# Altium PCB PI5_Robo_Board_PCB.PcbDoc (part 2 of 3)
Units mm, origin at the board's own origin, x right, y up, seen from the top; angles counter-clockwise.
Board outline 98.8 x 131.2 mm, 4 copper layers (TOP1, SIG2, SIG3, BOT4), stack 1.399 mm thick; 219 components, 149 nets, 779 pads, 462 vias.
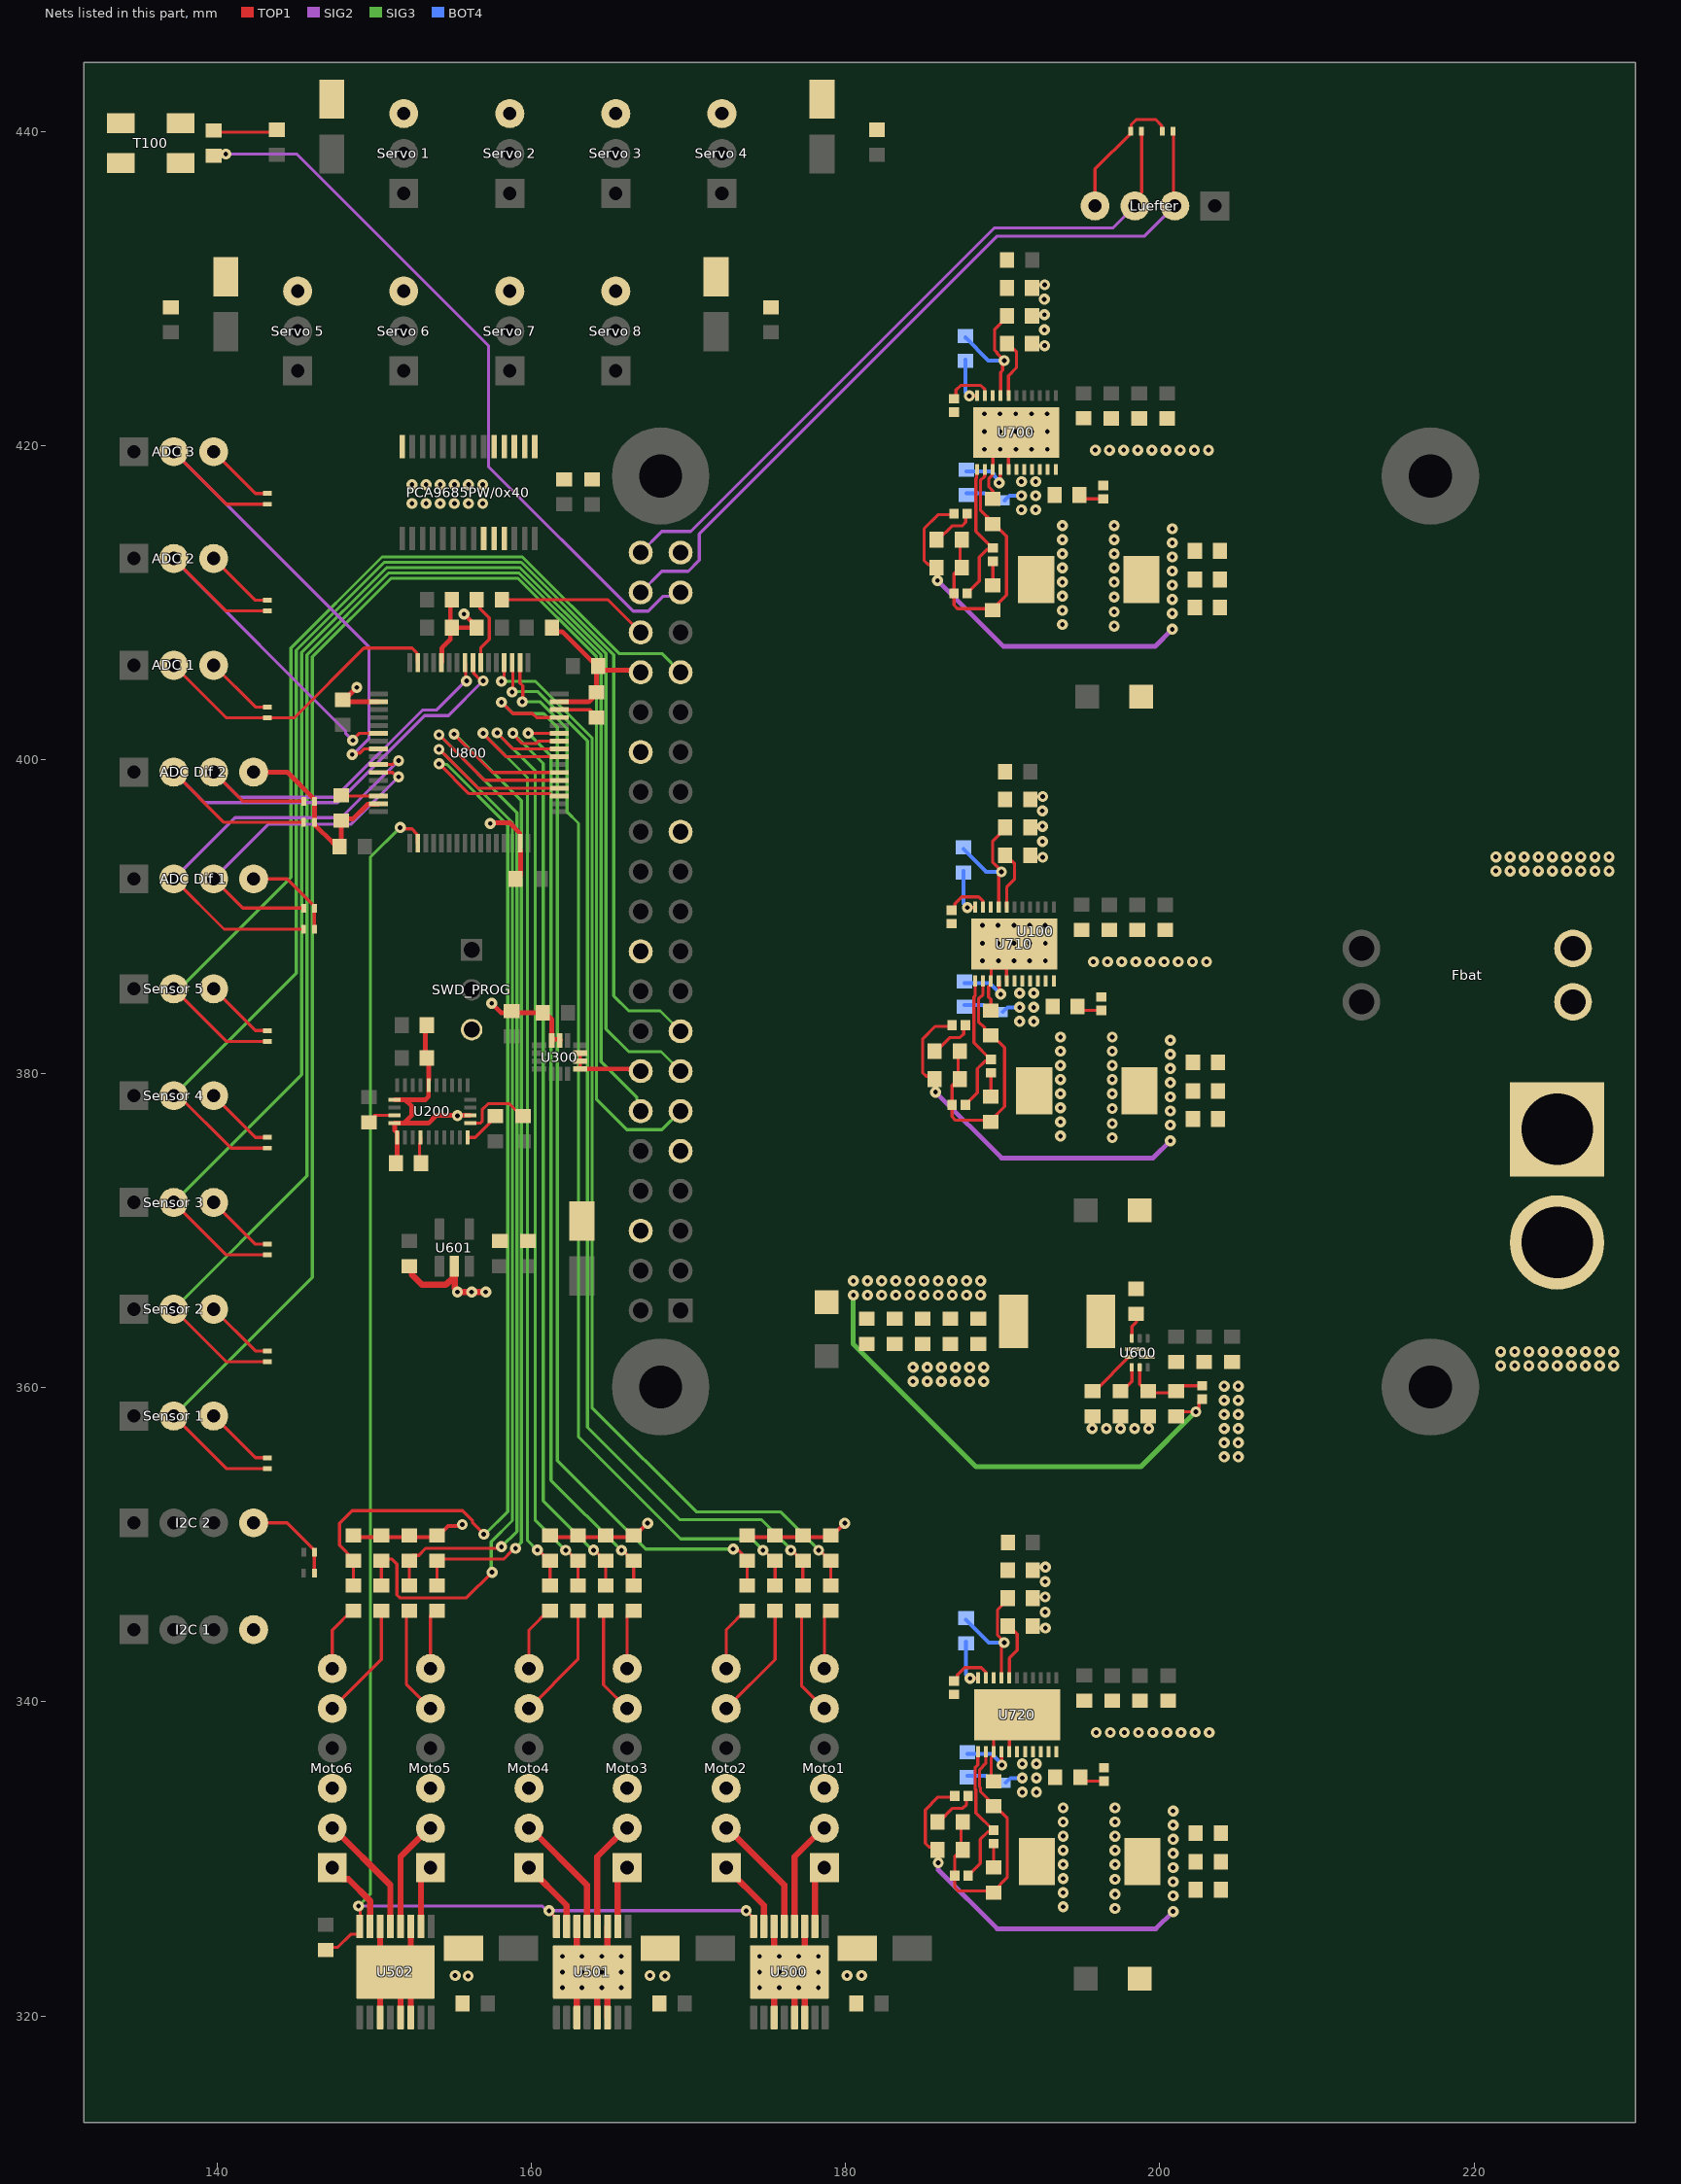
[diagram p4: the nets of this part, all layers, seen from the top]

## Via types
v1: diameter 0.7, hole 0.3, TOP1 to BOT4, tented both sides, 405 vias
v2: diameter 0.7, hole 0.3, TOP1 to BOT4, 57 vias

## Nets (pads, with @x,y where several pads share a name; then routed paths per layer and width w, separated by ;. In a path a pad name is that pad's centre, name@x,y a point inside that pad or via, vN(x,y) a via of type N, cw(c..) or ccw(c..) an arc to the next point about the centre after c; other vN are vias at no path point) (continued)
GND: "ADC 1.3" "ADC 2.3" "ADC 3.3" "ADC Dif 1.4" "ADC Dif 2.4" "I2C 1.4" "I2C 2.4" "Sensor 1.3" "Sensor 2.3" "Sensor 3.3" "Sensor 4.3" "Sensor 5.3" "Servo 1.3" "Servo 2.3" "Servo 3.3" "Servo 4.3" "Servo 5.3" "Servo 6.3" "Servo 7.3" "Servo 8.3" C100.2 C101.1 C102.2 C200.2 C201.2 C202.2 C300.2 C301.2 C400.1 C401.1 C402.2 C403.1 C404.1 C406.2 C410.2 C411.1 C412.1 C414.2 C500.2 C501.2 C502.2 C505.1 C507.1 C509.1 C600.1 C601.1 Cbyp700.2 Cbyp710.2 Cbyp720.2 Ccap800.1 Ccap801.1 Cin600.1 Cin601.1 Cin700.2 Cin701.2 Cin702.2 Cin710.2 Cin711.2 Cin712.2 Cin720.2 Cin721.2 Cin722.2 Cinx600.1 Cinx700.2 Cinx710.2 Cinx720.2 Cout600.2 Cout601.2 Cout602.2 Cout603.2 Cout700.2 Cout701.2 Cout710.2 Cout711.2 Cout720.2 Cout721.2 Coutx600.2 Coutx700.2 Coutx710.2 Coutx720.2 Csnubber700.1 Csnubber710.1 Csnubber720.1 Css600.2 Css700.1 Css710.1 Css720.1 Cstütz800.1 Cstütz801.1 Cstütz802.1 Cstütz803.1 Cstütz804.1 Cstütz805.1 Cstütz806.1 Cstütz807.1 Cvcc600.2 Cvcc700.2 Cvcc710.2 Cvcc720.2 J1.N Luefter.4 Moto1.3 Moto2.3 Moto3.3 Moto4.3 Moto5.3 Moto6.3 PCA9685PW/0x40.1 PCA9685PW/0x40.2 PCA9685PW/0x40.3 PCA9685PW/0x40.4 PCA9685PW/0x40.5 PCA9685PW/0x40.14 PCA9685PW/0x40.23 PCA9685PW/0x40.24 PCA9685PW/0x40.25 R511.1 R512.1 R513.1 R514.1 R523.1 R524.1 R525.1 R526.1 R535.1 R536.1 R537.1 R538.1 Rfbb600.1 Rfbb700.1 Rfbb710.1 Rfbb720.1 Roscet700.2 Roscet710.2 Roscet720.2 SWD_PROG.03 T100.1_2+ T100.2_2+ TVS1.1 TVS2.1 TVS3.1 TVS4.1 TVS5.1 TVS6.1 TVS7.1 TVS8.1 TVS9.1 TVS10.1 TVS11.1 TVS12.1 TVS13.1 TVS14.1 TVS15.1 TVS16.1 U100.6 U100.9 U100.14 U100.20 U100.25 U100.30 U100.34 U100.39 U200.2 U200.5 U200.6 U200.17 U200.25 U300.1 U300.2 U300.3 U300.6 U300.7 U500.3 U500.6 U500.11 U500.13 U500.14 U500.17 U501.3 U501.6 U501.11 U501.13 U501.14 U501.17 U502.3 U502.6 U502.11 U502.13 U502.14 U502.17 U600.4 U601.2 U700.3 U700.5 U700.23 U710.3 U710.5 U710.23 U720.3 U720.5 U720.23 U800.12 U800.18 U800.31 U800.47 U800.63 | length 203.1
  TOP1 w0.2: C102.2@139.775,439.948 143.75,439.948 C411.1@143.8,439.999 ; 139.78,358.2 142.437,355.543 TVS7.1@143.2,355.543 ; 139.78,365 142.437,362.343 TVS5.1@143.2,362.343 ; 139.78,371.8 142.437,369.143 TVS6.1@143.2,369.143 ; 139.78,378.6 142.437,375.943 TVS4.1@143.2,375.943 ; 139.78,385.4 142.437,382.743 TVS3.1@143.1,382.743 ; 139.78,406 142.437,403.343 TVS10.1@143.2,403.343 ; 139.78,412.8 142.437,410.143 TVS9.1@143.2,410.143 ; 139.78,419.6 142.437,416.943 TVS8.1@143.125,416.943 ; 142.32,351.4 144.456,351.4 146.19,349.666 TVS2.1@146.19,349.539 146.188,349.537 146.188,348.202 TVS1.1@146.186,348.2 ; 142.32,392.4 144.458,392.4 146.19,390.668 TVS14.1@146.19,390.541 TVS14.1@146.19,390.541 146.189,389.198 TVS13.1@146.188,389.197 ; U300.3@163.11,381.38 163.11,380.38 U300.1@163.185,380.305 ; U100.14@166.815,380.305 U100.14@166.96,380.16 ; Rfbb710.1@189.25,383.925 189.25,384.731 189.1,384.881 189.1,385.525 189.275,385.7 189.275,386.73 189.28,386.735 190.25,386.735 U710.5@190.25,385.9 ; Rfbb700.1@189.373,416.5 189.373,417.104 189.123,417.354 189.123,417.892 189.348,418.117 189.348,418.45 U700.3@189.386,418.488 ; U700.3@189.373,418.475 189.373,419.305 189.618,419.55 U700.23@190.373,419.55 ; Rfbb720.1@189.425,334.85 189.275,335 189.275,336.45 189.425,336.6 189.425,337.675 U720.23@189.875,338.125 ; U700.5@190.373,418.475 U700.23@190.373,419.55 ; U700.23@190.373,419.973 U700.23@190.373,419.55 ; U720.5@190.425,336.825 U720.23@190.425,337.65 ; Luefter.4@195.88,435.25 195.88,437.596 198.157,439.873 TVS16.1@198.157,440 198.185,440.027 198.185,440.435 198.5,440.75 199.75,440.75 200.13,440.37 200.13,440.027 TVS15.1@200.157,440 ; U720.23@190.425,337.65 190.425,338.037 190.42,337.693 190.42,337.655 U720.23@190.425,337.65
  TOP1 w0.25: R538.1@148.675,350.484 152.225,350.484 153.998,350.484 154,350.486 154.714,351.201 155.514,351.201 v1(155.6,351.287) ; R514.1@161.186,350.485 166.512,350.485 166.514,350.486 v1(167.403,351.375) ; R524.1@173.735,350.482 173.74,350.486 177.286,350.486 179.061,350.486 v1(179.95,351.375)
  TOP1 w0.3: 142.32,399.2 144.465,399.2 146.192,397.474 TVS12.1@146.192,397.347 146.189,397.344 146.189,396.003 TVS11.1@146.186,396 ; TVS11.1@146.186,395.873 147.378,394.681 147.669,394.681 147.9,394.45 147.9,396.228 148.656,396.228 149.575,397.147 150.248,397.147 U800.31@150.275,397.175 ; v1(148.889,404.589) 148,403.7 148.025,403.675 U800.18@150.275,403.675 ; U200.2@151.296,378.346 151.954,378.346 ; C202.2@151.459,374.356 151.459,375.622 151.458,375.624 U200.6@151.458,375.936 151.458,376.249 151.442,376.249 151.296,376.395 U200.5@151.296,376.846 151.889,376.846 ; C200.2@153.243,380.989 153.418,380.989 153.467,380.939 153.467,379.578 153.458,379.569 U200.25@153.458,379.266 ; C201.2@153.243,383.089 153.243,381.318 C200.2@153.495,381.066 ; U200.25@153.458,379.256 153.458,378.533 153.271,378.346 151.954,378.346 ; U800.12@154.275,406.175 154.303,406.202 154.303,407.099 154.847,407.644 Cstütz803.1@154.847,408.4 ; Cstütz807.1@154.89,409.962 154.847,409.919 Cstütz803.1@154.847,408.4 ; v1(155.713,409.261) 156.573,408.4 156.625,408.4 Cstütz803.1@154.847,408.4 ; U200.17@156.12,377.346 153.958,377.346 153.458,376.846 151.889,376.846 ; v1(157.38,395.93) 157.432,395.982 158.605,395.982 159.273,395.314 159.273,394.677 U800.47@159.275,394.675 159.275,394.23 159.328,394.178 159.328,392.626 Cstütz802.1@159.101,392.4 ; v1(157.475,384.475) 158.071,383.879 C301.2@158.745,383.879 ; C301.2@158.747,383.877 C300.2@160.834,383.877 ; C300.2@161.01,383.755 161.3,383.465 161.3,382.19 161.8,382.19 U300.6@161.85,382.14 ; Cstütz806.1@161.198,408.4 161.454,408.144 161.955,408.144 Cstütz800.1@164.149,405.95 ; U800.63@161.775,403.675 163.651,403.675 164.15,404.174 164.149,404.175 Cstütz800.1@164.149,405.95 ; U300.1@163.185,380.305 U100.14@166.815,380.305 ; U100.34@166.96,405.56 166.826,405.694 164.405,405.694 Cstütz800.1@164.149,405.95 ; 151.889,376.846 152.395,377.352 152.395,377.905 151.954,378.346
  TOP1 w0.4: U502.11@150.375,319.9 150.375,321.425 U502.17@150.75,321.8 ; U502.6@150.375,325.7 150.375,324.175 U502.17@150.75,323.8 ; U502.13@151.675,319.9 U502.17@151.675,321.525 ; U502.17@151.95,321.8 152.325,321.425 U502.14@152.325,319.9 ; U502.17@151.95,323.8 152.325,324.175 U502.3@152.325,325.7 ; C601.1@152.225,367.852 152.392,367.685 152.392,367.208 153.05,366.55 154.55,366.55 155.025,367.025 155.025,367.665 155.125,367.765 155.125,366.356 155.3,366.181 v1(155.3,366.1) v1(156.2,366.1) v1(157.1,366.1) ; U501.11@162.9,319.9 162.9,321.425 U501.17@163.275,321.8 ; U501.6@162.9,325.7 162.9,324.175 U501.17@163.275,323.8 ; U501.13@164.2,319.9 U501.17@164.2,321.525 ; v2(164.475,323.8) 164.85,324.175 U501.3@164.85,325.7 ; U501.14@164.85,319.9 164.85,321.425 v2(164.475,321.8) ; U500.11@175.45,319.9 175.45,321.425 U500.17@175.825,321.8 ; U500.6@175.45,325.7 175.45,324.175 U500.17@175.825,323.8 ; U500.13@176.75,319.9 176.75,321.525 v2(177.025,321.8) 177.4,321.425 U500.14@177.4,319.9 ; v2(177.025,323.8) 177.4,324.175 U500.3@177.4,325.7 ; U501.17@164.2,321.525 v2(164.475,321.8) ; U501.17@164.2,321.525 v2(164.475,321.8)
  other v1: 155.975,322.55 168.5,322.55 155.15,322.575 167.55,322.575 180.1,322.575 181.025,322.575 195.952,338.05 196.852,338.05 197.752,338.05 198.652,338.05 199.552,338.05 200.452,338.05 201.352,338.05 202.252,338.05 203.152,338.05 192.725,344.7 192.711,345.711 192.711,346.675 192.703,347.658 192.725,348.575 204.1,355.6 205,355.6 204.1,356.5 205,356.5 195.7,357.4 196.6,357.4 197.5,357.4 198.4,357.4 199.3,357.4 204.1,357.4 205,357.4 204.1,358.3 205,358.3 204.1,359.2 205,359.2 204.1,360.1 205,360.1 184.3,360.4 185.2,360.4 186.1,360.4 187,360.4 187.9,360.4 188.8,360.4 184.3,361.3 185.2,361.3 186.1,361.3 187,361.3 187.9,361.3 188.8,361.3 221.7,361.4 222.6,361.4 223.5,361.4 224.4,361.4 225.3,361.4 226.2,361.4 227.1,361.4 228,361.4 228.9,361.4 221.7,362.3 222.6,362.3 223.5,362.3 224.4,362.3 225.3,362.3 226.2,362.3 227.1,362.3 228,362.3 228.9,362.3 155.3,377.325 195.777,387.125 196.677,387.125 197.577,387.125 198.477,387.125 199.377,387.125 200.277,387.125 201.177,387.125 202.077,387.125 202.977,387.125 221.4,392.9 222.3,392.9 223.2,392.9 224.1,392.9 225,392.9 225.9,392.9 226.8,392.9 227.7,392.9 228.6,392.9 192.55,393.775 221.4,393.8 222.3,393.8 223.2,393.8 224.1,393.8 225,393.8 225.9,393.8 226.8,393.8 227.7,393.8 228.6,393.8 192.536,394.786 192.536,395.75 192.528,396.733 192.55,397.65 152.4,416.3 153.3,416.3 154.2,416.3 155.1,416.3 156,416.3 156.9,416.3 152.4,417.5 153.3,417.5 154.2,417.5 155.1,417.5 156,417.5 156.9,417.5 195.9,419.7 196.8,419.7 197.7,419.7 198.6,419.7 199.5,419.7 200.4,419.7 201.3,419.7 202.2,419.7 203.1,419.7 192.673,426.35 192.659,427.361 192.659,428.325 192.651,429.308 192.673,430.225
  other v2: 161.975,321.8 163.225,321.8 165.725,321.8 174.525,321.8 175.775,321.8 178.275,321.8 161.975,322.8 163.225,322.8 164.475,322.8 165.725,322.8 174.525,322.8 175.775,322.8 177.025,322.8 178.275,322.8 161.975,323.8 163.225,323.8 165.725,323.8 174.525,323.8 175.775,323.8 178.275,323.8 188.725,387.175 189.725,387.175 190.725,387.175 191.725,387.175 192.725,387.175 188.72,388.305 189.72,388.305 190.72,388.305 191.72,388.305 192.72,388.305 188.715,389.435 189.715,389.435 190.715,389.435 191.715,389.435 192.715,389.435 188.848,419.75 189.848,419.75 190.848,419.75 191.848,419.75 192.848,419.75 188.843,420.88 189.843,420.88 190.843,420.88 191.843,420.88 192.843,420.88 188.838,422.01 189.838,422.01 190.838,422.01 191.838,422.01 192.838,422.01
Motor_1_+: Moto1.1 U500.2 | length 4
  TOP1 w0.4: U500.2@178.05,325.7 178.05,328.84 Moto1.1@178.65,329.44
Motor_1_-: Moto1.2 U500.4 | length 7.1
  TOP1 w0.4: U500.4@176.75,325.7 176.75,330.133 178.578,331.96 Moto1.2@178.65,331.96
Motor_2_+: Moto2.1 U500.7 | length 4.7
  TOP1 w0.4: Moto2.1@172.4,329.44 174.8,327.04 U500.7@174.8,325.7
Motor_2_-: Moto2.2 U500.5 | length 7.8
  TOP1 w0.4: Moto2.2@172.4,331.96 172.472,331.96 176.1,328.333 U500.5@176.1,325.7
Motor_3_+: Moto3.1 U501.2 | length 4
  TOP1 w0.4: U501.2@165.5,325.7 165.5,328.84 Moto3.1@166.1,329.44
Motor_3_-: Moto3.2 U501.4 | length 7.1
  TOP1 w0.4: U501.4@164.2,325.7 164.2,330.133 166.028,331.96 Moto3.2@166.1,331.96
Motor_4_+: Moto4.1 U501.7 | length 4.7
  TOP1 w0.4: Moto4.1@159.85,329.44 162.25,327.04 U501.7@162.25,325.7
Motor_4_-: Moto4.2 U501.5 | length 7.8
  TOP1 w0.4: Moto4.2@159.85,331.96 159.923,331.96 163.55,328.333 U501.5@163.55,325.7
Motor_5_+: Moto5.1 U502.2 | length 4
  TOP1 w0.4: U502.2@152.975,325.7 152.975,328.84 Moto5.1@153.575,329.44
Motor_5_-: Moto5.2 U502.4 | length 7.1
  TOP1 w0.4: U502.4@151.675,325.7 151.675,330.133 153.503,331.96 Moto5.2@153.575,331.96
Motor_6_+: Moto6.1 U502.7 | length 4.9
  TOP1 w0.4: Moto6.1@147.325,329.44 148.05,328.715 148.346,328.715 149.75,327.311 149.75,325.725 U502.7@149.725,325.7
Motor_6_-: Moto6.2 U502.5 | length 7.8
  TOP1 w0.4: Moto6.2@147.325,331.96 147.397,331.96 151.025,328.333 U502.5@151.025,325.7
"NetADC 1_2": "ADC 1.2" TVS10.2 U800.15 | length 19.5
  TOP1 w0.2: 137.24,406 140.583,402.657 TVS10.2@143.2,402.657 144.907,402.657 149.35,407.1 152.4,407.1 152.723,406.777 152.723,406.227 U800.15@152.775,406.175
"NetADC 2_2": "ADC 2.2" TVS9.2 U800.22 | length 25.5
  TOP1 w0.2: 137.24,412.8 140.583,409.457 TVS9.2@143.2,409.457 ; v1(148.633,401.218) 148.633,401.248 149.06,401.675 U800.22@150.275,401.675
  SIG2 w0.2: 137.27,412.8 137.27,412.725 148.175,401.82 148.175,401.679 148.633,401.221 v1(148.633,401.218)
  SIG3 w0.2: 137.24,412.8 137.27,412.8
"NetADC 3_2": "ADC 3.2" TVS8.2 U800.24 | length 34.1
  TOP1 w0.2: 137.24,419.6 140.583,416.257 TVS8.2@143.2,416.257 ; v1(148.596,400.319) 148.691,400.414 149.089,400.414 149.35,400.675 U800.24@150.275,400.675
  SIG2 w0.2: 137.24,419.6 149.659,407.181 149.659,401.324 148.653,400.319 v1(148.596,400.319)
"NetADC Dif 1_2": "ADC Dif 1.2" TVS13.2 U800.26 | length 28.4
  TOP1 w0.2: 137.24,392.4 140.443,389.197 TVS13.2@145.502,389.197 ; U800.26@150.275,399.675 150.283,399.682 151.172,399.682 151.415,399.925 v1(151.55,399.925)
  SIG2 w0.2: 137.24,392.4 141.14,396.3 147.9,396.3 151.525,399.925 v1(151.55,399.925)
"NetADC Dif 1_3": "ADC Dif 1.3" TVS14.2 U800.27 | length 22.3
  TOP1 w0.2: 139.78,392.4 141.639,390.541 TVS14.2@145.504,390.541 ; U800.27@150.275,399.175 151.172,399.175 151.447,398.9 v1(151.55,398.9)
  SIG2 w0.2: 139.78,392.4 143.264,395.884 148.534,395.884 v1(151.55,398.9)
"NetADC Dif 2_2": "ADC Dif 2.2" TVS11.2 U800.8 | length 34.8
  TOP1 w0.2: 137.24,399.2 140.44,396 TVS11.2@145.5,396 ; U800.8@156.275,406.175 156.328,406.122 156.328,405.484 156.803,405.009 v1(156.93,405.009)
  SIG2 w0.2: 137.24,399.2 139.18,397.26 147.66,397.26 153.2,402.8 154.721,402.8 v1(156.93,405.009)
"NetADC Dif 2_3": "ADC Dif 2.3" TVS12.2 U800.9 | length 27.5
  TOP1 w0.2: 139.78,399.2 141.633,397.347 TVS12.2@145.506,397.347 ; U800.9@155.775,406.175 155.824,406.126 155.824,405.049 v1(155.873,405)
  SIG2 w0.2: 139.78,399.2 141.38,397.6 147.519,397.6 153.069,403.15 153.95,403.15 155.8,405 v1(155.873,405)
NetC102_1: C102.1 T100.1_1- T100.2_1- U100.37 | length 46.8
  TOP1 w0.2: C102.1@139.775,438.551 v1(140.549,438.551)
  SIG2 w0.2: v1(140.549,438.551) 145.074,438.551 157.275,426.35 157.275,418.646 166.468,409.453 167.452,409.453 168.395,410.396 169.256,410.396 U100.37@169.5,410.64
NetC202_1: C202.1 U200.9 | length 1.7
  TOP1 w0.2: C202.1@152.874,374.3 152.874,375.54 152.958,375.624 U200.9@152.958,375.936
NetCboot600_1: Cboot600.1 U600.7 | length 1.8
  TOP1 w0.2: U600.7@198.225,363.15 198.225,363.9 198.515,364.19 198.515,364.785 Cboot600.1@198.5,364.8
NetCboot600_2: Cboot600.2 L600.1 U600.8
NetCboot700_1: Cboot700.1 L700.1 Rsnubber700.2 U700.6 U700.7 U700.8 U700.9 U700.10 U700.11 | length 1.2
  BOT4 w0.25: Cboot700.1@190.151,416.5 190.151,416.52 190.326,416.695 190.346,416.695 190.451,416.8 v1(191.2,416.8)
  other v1: 193.8,408.6 193.8,409.5 193.8,410.4 193.8,411.3 193.8,412.2 193.8,413.1 193.8,414 193.8,414.9 191.2,415.9 192.1,415.9 192.1,416.8 191.2,417.7 192.1,417.7
NetCboot700_2: Cboot700.2 Rramp700.2 | length 1.8
  BOT4 w0.25: Rramp700.2@187.698,416.952 188.867,416.952 189.299,416.52 Cboot700.2@189.299,416.5
NetCboot710_1: Cboot710.1 L710.1 Rsnubber710.2 U710.6 U710.7 U710.8 U710.9 U710.10 U710.11 | length 1.2
  BOT4 w0.25: Cboot710.1@190.028,383.925 190.028,383.945 190.203,384.12 190.223,384.12 190.328,384.225 v1@191.05,384.225
  other v1: 193.677,376.025 193.677,376.925 193.677,377.825 193.677,378.725 193.677,379.625 193.677,380.525 193.677,381.425 193.677,382.325 191.077,383.325 191.977,383.325 191.077,384.225 191.977,384.225 191.077,385.125 191.977,385.125
NetCboot710_2: Cboot710.2 Rramp710.2 | length 1.8
  BOT4 w0.25: Rramp710.2@187.575,384.377 188.744,384.377 189.176,383.945 Cboot710.2@189.176,383.925
NetCboot720_1: Cboot720.1 L720.1 Rsnubber720.2 U720.6 U720.7 U720.8 U720.9 U720.10 U720.11 | length 1.2
  BOT4 w0.25: Cboot720.1@190.203,334.85 190.203,334.87 190.378,335.045 190.398,335.045 190.503,335.15 v1@191.225,335.15
  other v1: 193.852,326.95 193.852,327.85 193.852,328.75 193.852,329.65 193.852,330.55 193.852,331.45 193.852,332.35 193.852,333.25 191.252,334.25 192.152,334.25 191.252,335.15 192.152,335.15 191.252,336.05 192.152,336.05
NetCboot720_2: Cboot720.2 Rramp720.2 | length 1.8
  BOT4 w0.25: Rramp720.2@187.75,335.301 188.919,335.301 189.351,334.87 Cboot720.2@189.351,334.85
NetCbyp700_1: Cbyp700.1 Rpgood700.1 U700.19 | length 8.9
  TOP1 w0.2: U700.19@189.873,423.175 189.873,424.65 190.004,424.781 190.004,425.304 v1(190.1,425.4) 190.1,425.414 189.622,425.892 189.622,425.944 189.484,426.081 189.484,427.361 Cbyp700.1@190.373,428.25
  BOT4 w0.25: Rpgood700.1@187.623,426.872 189.095,425.4 v1(190.1,425.4)
NetCbyp710_1: Cbyp710.1 Rpgood710.1 U710.19 | length 8.8
  TOP1 w0.2: U710.19@189.75,390.6 189.75,392.621 189.925,392.796 189.925,392.891 189.498,393.317 189.498,393.331 189.361,393.468 189.361,394.786 Cbyp710.1@190.25,395.675
  BOT4 w0.25: Rpgood710.1@187.5,394.297 188.947,392.85 v1(189.925,392.85)
NetCbyp720_1: Cbyp720.1 Rpgood720.1 U720.19 | length 8.7
  TOP1 w0.2: U720.19@189.925,341.525 189.925,343.546 190.1,343.721 190.1,343.816 189.674,344.242 189.674,345.848 Cbyp720.1@190.425,346.6
  BOT4 w0.25: Rpgood720.1@187.675,345.222 189.122,343.775 v1(190.1,343.775)
NetCcap800_2: Ccap800.2 U800.30 | length 2.4
  TOP1 w0.2: Ccap800.2@147.9,397.625 147.95,397.675 U800.30@150.275,397.675
NetCcap801_2: Ccap801.2 U800.62 | length 2.5
  TOP1 w0.2: U800.62@161.775,403.175 163.752,403.175 Ccap801.2@164.15,402.777
NetCcomp700_1: Ccomp700.1 Rcomp700.1 | length 2.8
  TOP1 w0.2: Rcomp700.1@185.898,414.002 186.771,414.875 187.415,414.875 187.649,415.109 187.649,415.551 Ccomp700.1@187.749,415.652
NetCcomp700_2: Ccomp700.2 Cout700.1 Cout701.1 Coutx700.1 F6a.1 L700.2 Rfbt700.2 | length 23.4
  TOP1 w0.2: v1(185.848,411.4) 185.858,411.41 185.858,411.492 185.858,412.185 185.899,412.227 185.718,412.408 185.257,412.408 185,412.665 185,414.7 185.885,415.585 186.83,415.585 Ccomp700.2@186.897,415.652
  SIG2 w0.3: v1(185.848,411.4) 190.048,407.2 199.7,407.2 v1(200.8,408.3)
  other v1: 197.1,408.5 200.8,409.3 197.1,409.4 200.8,410.2 197.1,410.35 200.8,411.1 197.1,411.3 200.8,412 197.1,412.2 200.8,412.9 197.1,413.1 200.8,413.8 197.1,414 200.8,414.7 197.1,414.9
NetCcomp701_1: Ccomp701.1 Ccomp702.1 U700.1 | length 9.2
  TOP1 w0.2: Ccomp702.1@187.749,410.577 187.749,410.596 188.518,411.365 188.518,412.892 189.003,413.378 189.273,413.378 Ccomp701.1@189.373,413.478 189.353,413.478 188.297,414.534 188.297,417.887 188.348,417.938 188.348,418.45 U700.1@188.373,418.475
NetCcomp701_2: Ccomp701.2 Rcomp701.1 | length 1.6
  TOP1 w0.2: Rcomp701.1@189.373,411.002 Ccomp701.2@189.373,412.626
NetCcomp702_2: Ccomp702.2 Rcomp700.2 Rcomp701.2 Rfbb700.2 Rfbt700.1 U700.2 | length 16.9
  TOP1 w0.2: Rfbt700.1@187.296,412.227 Rcomp700.2@187.296,414.001 ; Rfbt700.1@187.296,412.227 186.897,411.827 186.897,410.576 186.897,409.838 187.131,409.603 Rcomp701.2@189.372,409.603 ; U700.2@188.873,418.475 188.848,418.45 188.848,418.027 188.587,417.766 188.587,415.889 189.373,415.103 190.248,414.228 190.248,410.48 Rcomp701.2@189.373,409.605
NetCcomp710_1: Ccomp710.1 Rcomp710.1 | length 2.8
  TOP1 w0.2: Rcomp710.1@185.775,381.427 186.648,382.3 187.292,382.3 187.526,382.534 187.526,382.976 Ccomp710.1@187.626,383.077
NetCcomp710_2: Ccomp710.2 Cout710.1 Cout711.1 Coutx710.1 F6b.1 L710.2 Rfbt710.2 | length 23.4
  TOP1 w0.2: v1(185.725,378.825) 185.735,378.835 185.735,378.917 185.735,379.61 185.776,379.652 185.595,379.833 185.134,379.833 184.9,380.067 184.9,382.2 185.71,383.01 186.707,383.01 Ccomp710.2@186.774,383.077
  SIG2 w0.3: v1(185.725,378.825) 189.925,374.625 199.577,374.625 v1(200.677,375.725)
  other v1: 196.977,375.925 200.677,376.725 196.977,376.825 200.677,377.625 196.977,377.775 200.677,378.525 196.977,378.725 200.677,379.425 196.977,379.625 200.677,380.325 196.977,380.525 200.677,381.225 196.977,381.425 200.677,382.125 196.977,382.325
NetCcomp711_1: Ccomp711.1 Ccomp712.1 U710.1 | length 9.2
  TOP1 w0.2: Ccomp712.1@187.626,378.002 187.626,378.021 188.395,378.79 188.395,380.317 188.88,380.802 189.15,380.802 Ccomp711.1@189.25,380.903 189.23,380.903 188.174,381.959 188.174,384.878 188.25,384.954 U710.1@188.25,385.9
NetCcomp711_2: Ccomp711.2 Rcomp711.1 | length 1.6
  TOP1 w0.2: Rcomp711.1@189.25,378.427 Ccomp711.2@189.25,380.051
NetCcomp712_2: Ccomp712.2 Rcomp710.2 Rcomp711.2 Rfbb710.2 Rfbt710.1 U710.2 | length 17.1
  TOP1 w0.2: Rfbt710.1@187.173,379.652 Rcomp710.2@187.173,381.426 ; Rfbt710.1@187.173,379.652 186.774,379.252 186.774,377.263 187.008,377.028 Rcomp711.2@189.249,377.028 ; U710.2@188.75,385.9 188.75,385.043 188.464,384.758 188.464,383.314 188.85,382.928 188.85,382.777 189.098,382.528 189.25,382.528 189.301,382.477 190.125,381.653 190.125,377.905 189.25,377.03 Rcomp711.2@189.301,376.979
NetCcomp720_1: Ccomp720.1 Rcomp720.1 | length 2.8
  TOP1 w0.2: Rcomp720.1@185.95,332.351 186.823,333.225 187.467,333.225 187.701,333.459 187.701,333.901 Ccomp720.1@187.801,334.001
NetCcomp720_2: Ccomp720.2 Cout720.1 Cout721.1 Coutx720.1 F6c.1 L720.2 Rfbt720.2 | length 23.7
  TOP1 w0.2: v1(185.9,329.75) 185.91,329.76 185.91,329.842 185.91,330.535 185.951,330.577 185.77,330.758 185.309,330.758 185.075,330.992 185.075,333.125 185.885,333.935 186.882,333.935 Ccomp720.2@186.949,334.001
  SIG2 w0.3: v1(185.9,329.75) 185.9,329.3 189.65,325.55 199.752,325.55 v1(200.852,326.65)
  other v1: 197.152,326.85 200.852,327.65 197.152,327.75 200.852,328.55 197.152,328.7 200.852,329.45 197.152,329.65 200.852,330.35 197.152,330.55 200.852,331.25 197.152,331.45 200.852,332.15 197.152,332.35 200.852,333.05 197.152,333.25
NetCcomp721_1: Ccomp721.1 Ccomp722.1 U720.1 | length 9.3
  TOP1 w0.2: Ccomp722.1@187.801,328.926 187.801,328.946 188.57,329.715 188.57,331.242 189.055,331.728 189.325,331.728 Ccomp721.1@189.425,331.827 189.405,331.827 188.301,332.932 188.301,334.404 188.246,334.459 188.246,335.806 188.425,335.985 U720.1@188.425,336.825
NetCcomp721_2: Ccomp721.2 Rcomp721.1 | length 1.6
  TOP1 w0.2: Rcomp721.1@189.425,329.352 Ccomp721.2@189.425,330.975
NetCcomp722_2: Ccomp722.2 Rcomp720.2 Rcomp721.2 Rfbb720.2 Rfbt720.1 U720.2 | length 17
  TOP1 w0.2: Rfbt720.1@187.348,330.577 186.949,330.177 Ccomp722.2@186.949,328.926 186.949,328.188 187.183,327.953 Rcomp721.2@189.424,327.953 ; Rfbt720.1@187.348,330.577 Rcomp720.2@187.348,332.351 ; U720.2@188.925,336.825 188.925,336.075 188.536,335.686 188.536,334.579 188.591,334.524 188.591,334.287 189.425,333.453 190.3,332.578 190.3,328.83 Rcomp721.2@189.425,327.954
NetCff600_1: Cff600.1 Cout600.1 Cout601.1 Cout602.1 Cout603.1 Coutx600.1 F5.1 L600.2 Rftb600.2 | length 32
  TOP1 w0.2: Rftb600.2@201.05,358.276 201.249,358.475 v1(202.3,358.475) 202.3,358.529 202.505,358.734 202.505,359.099 202.68,359.274 Cff600.1@202.7,359.274
  SIG3 w0.3: v1@180.475,365.95 180.475,362.8 188.3,354.975 198.8,354.975 v1(202.3,358.475)
  other v1: 180.5,365.9 181.4,365.9 182.3,365.9 183.2,365.9 184.1,365.9 185,365.9 185.9,365.9 186.8,365.9 187.7,365.9 188.6,365.9 180.5,366.8 181.4,366.8 182.3,366.8 183.2,366.8 184.1,366.8 185,366.8 185.9,366.8 186.8,366.8 187.7,366.8 188.6,366.8
NetCff600_2: Cff600.2 Rfbb600.2 Rftb600.1 U600.2 | length 5.5
  TOP1 w0.2: U600.2@198.725,361.3 198.725,360.222 Rfbb600.2@199.275,359.672 ; Rfbb600.2@199.276,359.673 201.049,359.673 201.503,360.126 Cff600.2@202.7,360.126
NetCsnubber700_2: Csnubber700.2 Rsnubber700.1 | length 1.6
  TOP1 w0.2: Rsnubber700.1@194.898,416.85 195.149,416.599 Csnubber700.2@196.398,416.599
NetCsnubber710_2: Csnubber710.2 Rsnubber710.1 | length 1.6
  TOP1 w0.2: Rsnubber710.1@194.775,384.275 195.026,384.024 Csnubber710.2@196.275,384.024
NetCsnubber720_2: Csnubber720.2 Rsnubber720.1 | length 1.6
  TOP1 w0.2: Rsnubber720.1@194.95,335.2 195.201,334.949 Csnubber720.2@196.45,334.949
NetCss600_1: Css600.1 U600.1 | length 1.9
  TOP1 w0.2: Css600.1@197.5,359.672 198.225,360.397 U600.1@198.225,361.3
NetCss700_2: Css700.2 U700.21 | length 3
  TOP1 w0.2: Css700.2@187.023,422.976 187.023,423.523 187.325,423.825 188.598,423.825 188.873,423.55 U700.21@188.873,423.175
NetCss710_2: Css710.2 U710.21 | length 3
  TOP1 w0.2: Css710.2@186.75,390.401 186.77,390.401 186.97,390.601 186.97,390.82 187.4,391.25 188.475,391.25 188.75,390.975 U710.21@188.75,390.6
NetCss720_2: Css720.2 U720.21 | length 3
  TOP1 w0.2: Css720.2@186.9,341.326 186.92,341.326 187.12,341.526 187.12,341.72 187.575,342.175 188.65,342.175 188.925,341.9 U720.21@188.925,341.525
NetCvcc600_1: Cvcc600.1 U600.9 | length 3.3
  TOP1 w0.2: Cvcc600.1@195.725,359.674 195.906,359.855 195.93,359.855 U600.9@198.05,361.975
NetCvcc700_1: Cvcc700.1 Rkelvin700.1 U700.20
NetCvcc710_1: Cvcc710.1 Rkelvin710.1 U710.20
NetCvcc720_1: Cvcc720.1 Rkelvin720.1 U720.20
NetFbat_1_1: Fbat.1_1 Fbat.1_2 J1.P
NetLuefter_2: Luefter.2 TVS15.2 U100.38 | length 50
  TOP1 w0.2: TVS15.2@200.843,440 200.87,439.973 200.87,435.34 Luefter.2@200.96,435.25
  SIG2 w0.2: U100.38@166.96,410.64 168.313,411.993 169.992,411.993 170.687,412.688 170.687,414.362 189.65,433.325 199.035,433.325 Luefter.2@200.96,435.25
NetLuefter_3: Luefter.3 TVS16.2 U100.40 | length 45.5
  TOP1 w0.2: Luefter.3@198.42,435.25 198.42,435.683 198.843,436.106 TVS16.2@198.843,440
  SIG2 w0.2: U100.40@166.96,413.18 168.305,414.525 170.15,414.525 189.475,433.85 197.02,433.85 Luefter.3@198.42,435.25
NetMoto1_5: Moto1.5 R507.1 | length 7
  TOP1 w0.2: R507.1@177.286,345.913 177.2,345.827 177.2,341.03 Moto1.5@178.65,339.58
NetMoto1_6: Moto1.6 R508.1 | length 4
  TOP1 w0.2: Moto1.6@178.65,342.12 178.65,345.503 R508.1@179.061,345.914
NetMoto2_5: Moto2.5 R519.1 | length 7.6
  TOP1 w0.2: Moto2.5@172.4,339.58 175.51,342.69 R519.1@175.51,345.911
NetMoto2_6: Moto2.6 R520.1 | length 4.3
  TOP1 w0.2: Moto2.6@172.4,342.12 172.4,344.576 R520.1@173.735,345.911
NetMoto3_5: Moto3.5 R529.1 | length 7
  TOP1 w0.2: R529.1@164.739,345.913 164.6,345.774 164.6,341.08 Moto3.5@166.1,339.58
NetMoto3_6: Moto3.6 R530.1 | length 4
  TOP1 w0.2: Moto3.6@166.1,342.12 166.1,345.5 R530.1@166.514,345.914
NetMoto4_5: Moto4.5 R509.1 | length 7.6
  TOP1 w0.2: Moto4.5@159.85,339.58 162.961,342.691 R509.1@162.961,345.914
NetMoto4_6: Moto4.6 R510.1 | length 4.3
  TOP1 w0.2: Moto4.6@159.85,342.12 159.85,344.578 R510.1@161.186,345.914
NetMoto5_5: Moto5.5 R521.1 | length 7
  TOP1 w0.2: R521.1@152.225,345.912 152.05,345.737 152.05,341.105 Moto5.5@153.575,339.58
NetMoto5_6: Moto5.6 R522.1 | length 4
  TOP1 w0.2: Moto5.6@153.575,342.12 153.575,345.489 R522.1@154,345.914
NetMoto6_5: Moto6.5 R531.1 | length 7.6
  TOP1 w0.2: Moto6.5@147.325,339.58 150.45,342.705 R531.1@150.45,345.914
NetMoto6_6: Moto6.6 R532.1 | length 4.4
  TOP1 w0.2: Moto6.6@147.325,342.12 147.325,344.564 R532.1@148.675,345.914
NetR200_1: R200.1 U200.15 | length 2.3
  TOP1 w0.2: U200.15@155.958,375.936 156.437,375.936 R200.1@157.7,377.199
NetR201_1: R201.1 U200.16 | length 4.7
  TOP1 w0.2: U200.16@156.12,376.846 156.749,376.846 156.867,376.963 156.867,377.699 157.255,378.087 158.586,378.087 R201.1@159.475,377.199
NetR202_1: R202.1 U200.4 | length 2
  TOP1 w0.2: R202.1@149.538,376.87 149.666,376.998 150.014,377.346 U200.4@151.296,377.346
NetR506_1: R506.1 U500.8 U501.8 U502.8 U800.34 | length 102.2
  TOP1 w0.2: R506.1@146.9,324.3 146.97,324.37 147.67,324.37 148.499,325.199 149.05,325.199 149.075,325.224 U502.8@149.075,325.7 149.075,326.225 149.1,326.25 149.1,326.765 149,326.865 v1(149,327) ; v1(151.65,395.675) 151.743,395.582 152.4,395.582 152.723,395.259 152.723,394.727 U800.34@152.775,394.675 ; v1(161.125,326.7) U501.8@161.6,326.225 ; v1(173.676,326.701) 173.676,326.699 U500.8@174.15,326.225
  SIG2 w0.2: v1(149,327) 160.69,327 160.99,326.7 v1(161.125,326.7) v1@173.675,326.7
  SIG3 w0.2: v1(149,327) 149.75,327.75 149.75,393.775 v1(151.65,395.675) ; v1@173.675,326.7 v1(173.676,326.701)
NetR507_2: R507.2 R511.2 U800.3 | length 70.7
  TOP1 w0.2: v1(158.776,404.298) 158.825,404.348 158.825,406.125 U800.3@158.775,406.175 ; v1(176.513,349.655) 176.564,349.655 177.13,349.089 177.286,349.089 R507.2@177.286,347.31
  SIG3 w0.2: v1(158.776,404.298) 158.802,404.325 160.425,404.325 163.572,401.178 163.572,357.478 169.45,351.6 174.65,351.6 176.513,349.737 v1(176.513,349.655)
NetR508_2: R508.2 R512.2 U800.4 | length 72.1
  TOP1 w0.2: v1(158.1,404.975) 158.1,405.11 158.268,405.278 158.268,406.167 U800.4@158.275,406.175 ; v1(178.289,349.655) 178.339,349.655 178.905,349.089 179.061,349.089 R508.2@179.061,347.311
  SIG3 w0.2: v1(158.1,404.975) 160.275,404.975 163.862,401.388 163.862,358.738 170.5,352.1 175.844,352.1 v1(178.289,349.655)
NetR509_2: R509.2 R513.2 U800.57 | length 60.9
  TOP1 w0.2: v1(157.825,401.7) 158.85,400.675 U800.57@161.775,400.675 ; v1(162.189,349.655) 162.239,349.655 162.804,349.091 R513.2@162.961,349.091 ; R509.2@162.961,347.311 R513.2@162.961,348.964
  SIG3 w0.2: v1(157.825,401.7) 160.25,399.275 160.25,351.55 162.145,349.655 v1(162.189,349.655)
NetR510_2: R510.2 R514.2 U800.56 | length 61.8
  TOP1 w0.2: v1(156.925,401.675) 156.925,401.663 158.413,400.175 U800.56@161.775,400.175 ; v1(160.39,349.67) 160.449,349.67 161.032,349.088 161.186,349.088 R510.2@161.186,347.311
  SIG3 w0.2: v1(156.925,401.675) 159.75,398.85 159.75,350.275 160.355,349.67 v1(160.39,349.67)
NetR519_2: R519.2 R523.2 U800.2 | length 69.1
  TOP1 w0.2: U800.2@159.275,406.175 159.275,404.875 159.45,404.7 159.45,403.7 v1(159.425,403.675) ; v1(174.739,349.655) 174.789,349.655 175.356,349.088 175.51,349.088 R519.2@175.51,347.308
  SIG3 w0.2: v1(159.425,403.675) 160.575,403.675 162.272,401.978 162.272,396.67 163,395.942 163,356.875 169.5,350.375 174.019,350.375 v1(174.739,349.655)
NetR520_2: R520.2 R524.2 U800.61 | length 71.5
  TOP1 w0.2: v1(158.1,403.65) 158.825,402.925 160.087,402.925 160.338,402.675 U800.61@161.775,402.675 ; v1(172.85,349.725) 172.946,349.629 173.191,349.629 173.735,349.085 R520.2@173.735,347.308
  SIG3 w0.2: v1(158.1,403.65) 158.825,402.925 160.779,402.925 161.65,402.054 161.65,355.35 167.275,349.725 v1(172.85,349.725)
NetR521_2: R521.2 R525.2 U800.53 | length 71
  TOP1 w0.2: R521.2@152.225,347.309 152.225,349.089 152.469,349.333 152.833,349.333 153.282,349.782 158.008,349.782 v1(158.1,349.874) ; v1(154.125,401.575) 157.025,398.675 U800.53@161.775,398.675
  SIG3 w0.2: v1(154.125,401.575) 159.08,396.62 159.08,350.854 v1(158.1,349.874)
NetR522_2: R522.2 R526.2 U800.54 | length 68.6
  TOP1 w0.2: R522.2@154,347.311 154,349.089 158.235,349.089 158.727,349.581 158.727,349.609 158.895,349.777 v1(158.995,349.777) ; v1(155.075,401.625) 157.525,399.175 U800.54@161.775,399.175
  SIG3 w0.2: v1(155.075,401.625) 155.125,401.625 159.37,397.38 159.37,350.152 v1(158.995,349.777)
NetR529_2: R529.2 R535.2 U800.58 | length 60.3
  TOP1 w0.2: v1(158.825,401.675) 158.825,401.608 159.408,401.025 160.324,401.025 160.474,401.175 U800.58@161.775,401.175 ; v1(163.963,349.657) 164.015,349.657 164.583,349.089 164.739,349.089 R529.2@164.739,347.31
  SIG3 w0.2: v1(158.825,401.675) 160.75,399.75 160.75,352.8 163.893,349.657 v1(163.963,349.657)
NetR530_2: R530.2 R536.2 U800.59 | length 59.3
  TOP1 w0.2: v1(159.8,401.675) U800.59@161.775,401.675 ; v1(165.742,349.655) 165.792,349.655 166.358,349.089 166.514,349.089 R530.2@166.514,347.311
  SIG3 w0.2: v1(159.8,401.675) 161.25,400.225 161.25,354.1 165.695,349.655 v1(165.742,349.655)
NetR531_2: R531.2 R537.2 U800.52 | length 75.3
  TOP1 w0.2: R531.2@150.45,347.311 150.45,349.09 151.131,349.09 151.446,348.775 151.446,346.804 151.625,346.625 155.875,346.625 v1(157.5,348.25) ; v1(154.125,400.65) 156.6,398.175 U800.52@161.775,398.175
  SIG3 w0.2: v1(154.125,400.65) 158.79,395.985 158.79,351.54 157.45,350.2 157.45,348.3 v1(157.5,348.25)
NetR532_2: R532.2 R538.2 U800.51 | length 75
  TOP1 w0.2: R532.2@148.675,347.311 148.675,349.087 147.786,349.976 147.786,351.373 148.588,352.175 155.631,352.175 156.25,351.556 156.25,351.425 156.975,350.7 v1(156.975,350.675) ; v1(154.128,399.728) 156.033,397.822 161.183,397.822 161.331,397.675 U800.51@161.775,397.675
  SIG3 w0.2: v1(154.128,399.728) 154.162,399.694 154.613,399.694 158.5,395.807 158.5,352.116 157.059,350.675 v1(156.975,350.675)
NetR800_1: R800.1 U100.36 | length 9.8
  TOP1 w0.2: R800.1@158.023,410.175 164.885,410.175 U100.36@166.96,408.1
NetR800_2: R800.2 U800.7 | length 4.5
  TOP1 w0.2: R800.2@156.626,410.175 156.739,410.063 156.739,409.611 157.325,409.025 157.325,407.65 156.775,407.1 U800.7@156.775,406.175
NetRoscet700_1: Roscet700.1 U700.18 | length 3.7
  TOP1 w0.2: U700.18@190.373,423.175 190.373,423.473 190.377,423.477 190.377,424.439 190.873,424.936 190.873,425.975 Roscet700.1@190.373,426.475
NetRoscet710_1: Roscet710.1 U710.18 | length 3.7
  TOP1 w0.2: U710.18@190.25,390.6 190.25,390.898 190.254,390.902 190.254,391.864 190.75,392.361 190.75,393.4 Roscet710.1@190.25,393.9
NetRoscet720_1: Roscet720.1 U720.18 | length 3.7
  TOP1 w0.2: U720.18@190.425,341.525 190.425,341.823 190.429,341.827 190.429,342.789 190.925,343.286 190.925,344.325 Roscet720.1@190.425,344.825
NetRpgood700_2: Rpgood700.2 U700.22 | length 2.9
  TOP1 w0.2: v1(187.873,423.15) 187.885,423.163 188.373,423.163 U700.22@188.373,423.175
  BOT4 w0.25: Rpgood700.2@187.623,425.475 187.623,423.4 v1(187.873,423.15)
NetRpgood710_2: Rpgood710.2 U710.22 | length 2.9
  TOP1 w0.2: v1(187.75,390.575) 187.762,390.587 188.25,390.587 U710.22@188.25,390.6
  BOT4 w0.25: Rpgood710.2@187.5,392.9 187.5,390.825 v1(187.75,390.575)
NetRpgood720_2: Rpgood720.2 U720.22 | length 2.9
  TOP1 w0.2: v1(187.925,341.5) 187.937,341.512 188.425,341.512 U720.22@188.425,341.525
  BOT4 w0.25: Rpgood720.2@187.675,343.825 187.675,341.75 v1(187.925,341.5)
NetRramp700_1: Rramp700.1 U700.4 | length 3.4
  TOP1 w0.2: v1(189.773,417.623) 189.848,417.698 189.848,418.45 U700.4@189.873,418.475
  BOT4 w0.25: Rramp700.1@187.698,418.349 189.249,418.349 189.45,418.148 189.45,418.068 189.773,417.745 v1(189.773,417.623)
NetRramp710_1: Rramp710.1 U710.4 | length 3.5
  TOP1 w0.2: U710.4@189.75,385.9 189.775,385.875 189.775,385.297 189.879,385.193 v1(189.879,385.058)
  BOT4 w0.25: Rramp710.1@187.575,385.774 189.164,385.774 v1(189.879,385.058)
NetRramp720_1: Rramp720.1 U720.4 | length 3.4
  TOP1 w0.2: U720.4@189.925,336.825 189.937,336.812 189.937,335.988 v1(189.95,335.975)
  BOT4 w0.25: Rramp720.1@187.75,336.698 189.301,336.698 189.95,336.05 v1(189.95,335.975)
"NetSensor 1_2": "Sensor 1.2" TVS7.2 U100.11 | length 116.4
  TOP1 w0.2: 137.24,358.2 140.583,354.857 TVS7.2@143.2,354.857
  SIG3 w0.2: 137.24,358.2 146.06,367.02 146.06,406.537 151.063,411.54 159.145,411.54 164.152,406.532 164.152,378.348 166.067,376.433 168.313,376.433 U100.11@169.5,377.62
"NetSensor 2_2": "Sensor 2.2" TVS5.2 U100.12 | length 105.7
  TOP1 w0.2: 137.24,365 140.583,361.657 TVS5.2@143.2,361.657
  SIG3 w0.2: 137.24,365 145.72,373.48 145.72,406.678 150.922,411.88 159.215,411.88 164.442,406.653 164.442,380.758 166.716,378.484 166.716,377.864 U100.12@166.96,377.62
"NetSensor 3_2": "Sensor 3.2" TVS6.2 U100.13 | length 99.4
  TOP1 w0.2: 137.24,371.8 140.583,368.457 TVS6.2@143.2,368.457
  SIG3 w0.2: 137.24,371.8 145.38,379.94 145.38,406.818 150.782,412.22 159.285,412.22 164.75,406.755 164.75,382.85 166.2,381.4 168.26,381.4 U100.13@169.5,380.16
"NetSensor 4_2": "Sensor 4.2" TVS4.2 U100.15 | length 90.8
  TOP1 w0.2: 137.24,378.6 137.535,378.6 140.878,375.257 TVS4.2@143.2,375.257
  SIG3 w0.2: 137.24,378.6 145.04,386.4 145.04,406.959 150.641,412.56 159.355,412.56 165.25,406.665 165.25,384.95 166.2,384 168.2,384 U100.15@169.5,382.7
"NetSensor 5_2": "Sensor 5.2" TVS3.2 U100.33 | length 62.5
  TOP1 w0.2: 137.24,385.4 140.583,382.057 TVS3.2@143.1,382.057
  SIG3 w0.2: 137.24,385.4 137.6,385.4 144.7,392.5 144.7,407.1 150.5,412.9 159.425,412.9 165.578,406.747 168.313,406.747 U100.33@169.5,405.56